# Altium PCB LM2596S pcb.pcbdoc
Units mil, origin at the board's own origin, x right, y up, seen from the top; angles counter-clockwise.
Board outline 3275 x 2189 mil, 2 copper layers (Top Layer, Bottom Layer); 12 components, 6 nets, 33 pads, 20 vias.
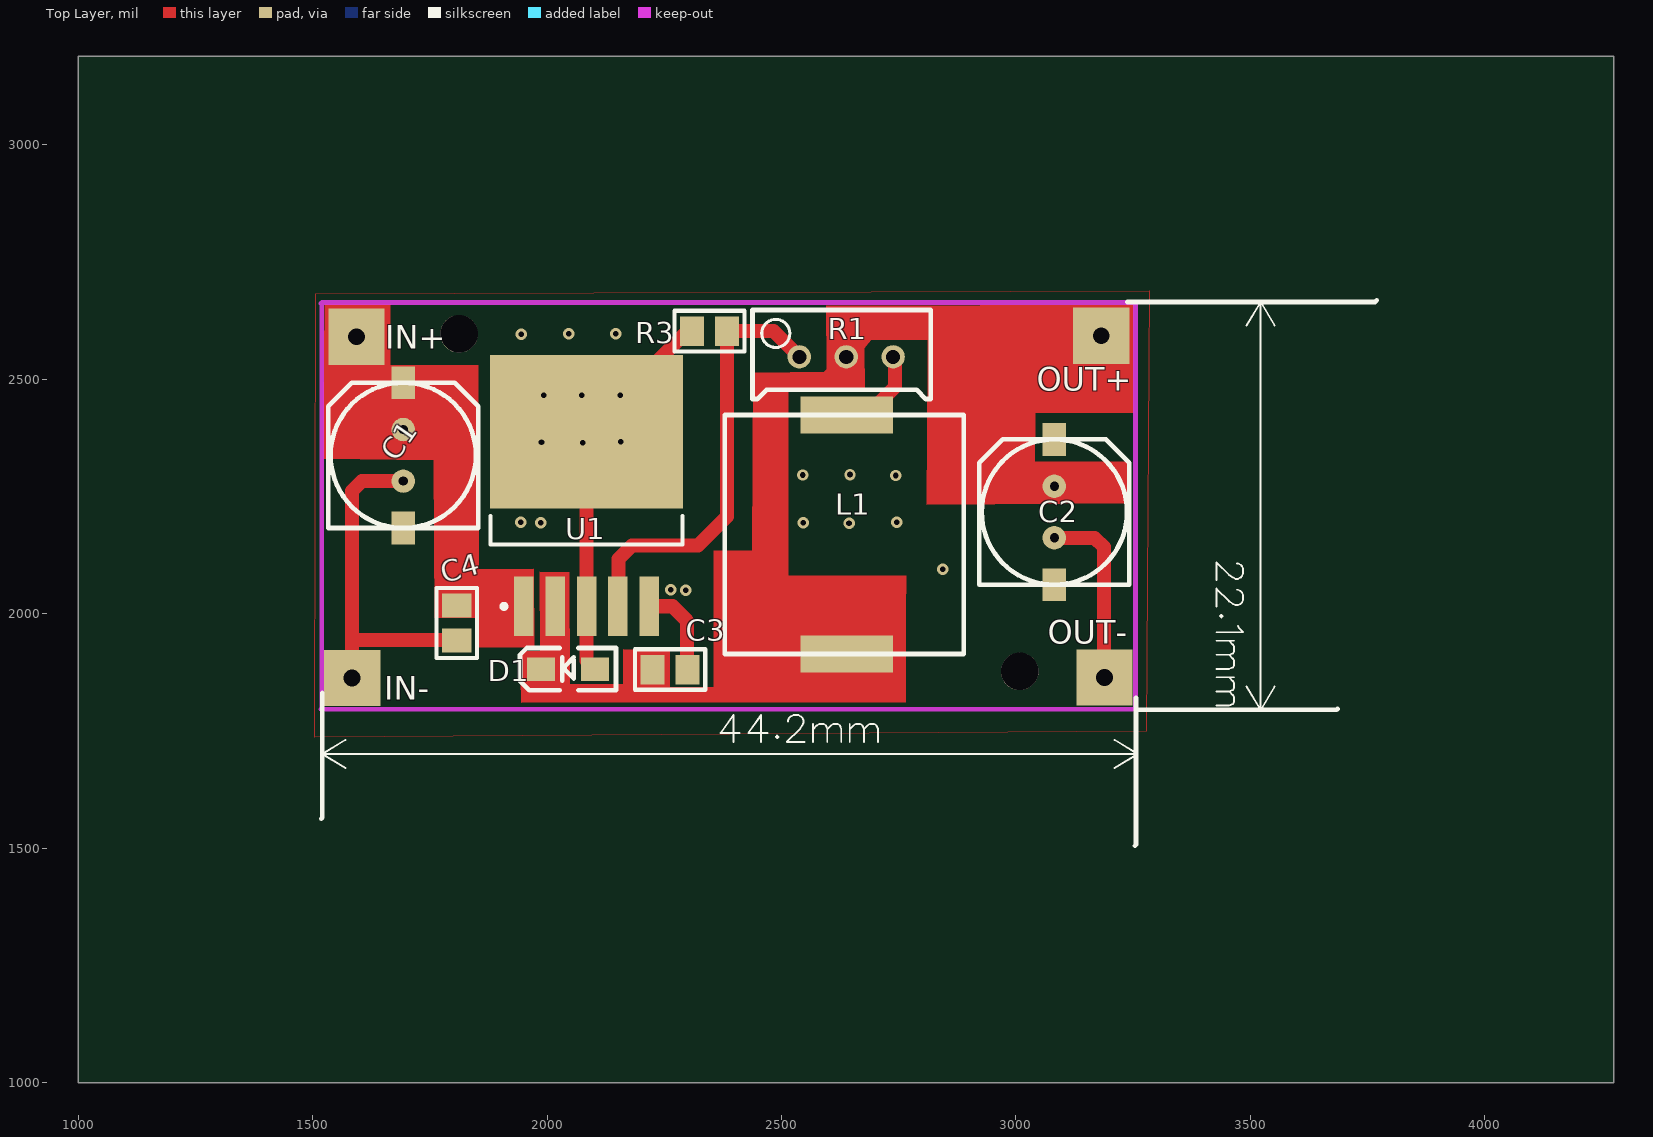
[diagram p0: Top Layer view]
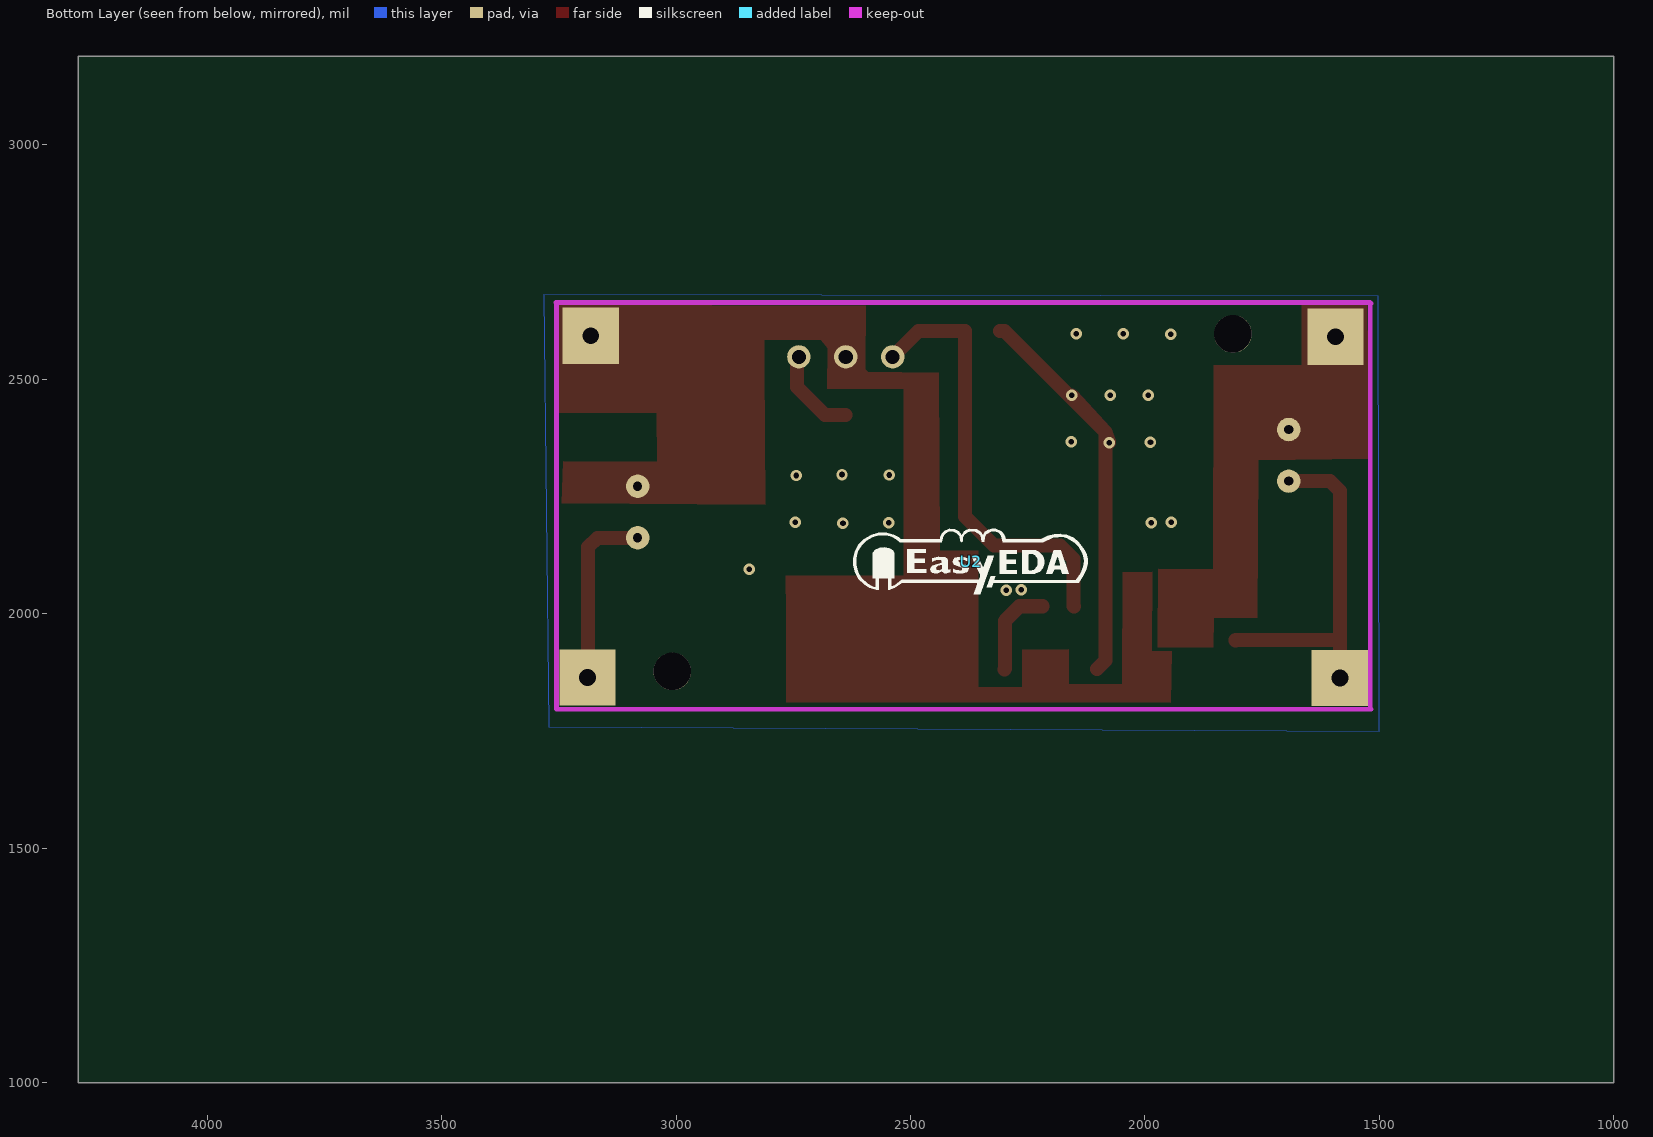
[diagram p1: Bottom Layer view, seen from below]

## Layer stack, top to bottom
Top Solder: solder mask 0.4, Solder Resist, Dk 3.5
Top Layer: signal copper 1.4
Dielectric1: dielectric 12.6, FR-4, Dk 4.8
Bottom Layer: signal copper 1.4
Bottom Solder: solder mask 0.4, Solder Resist, Dk 3.5

## Board outline
4275,1000 1000,1000 1000,3189 4275,3189

## Design rules (kind name [scope] priority, off if disabled: settings)
Clearance [All] p1: gap=10 ignorepadtopadclearanceinfootprint=FALSE except(0: Arc-Hole Track-Hole SMDPad-Hole THPad-Hole Via-Hole Fill-Hole Poly-Hole Region-Hole Text-Hole)
PolygonConnect [All] p1: connectstyle=Relief reliefconductorwidth=10 reliefentries=4 polygonreliefangle="90 Angle" airgapwidth=10
RoutingVias [All] p1: holewidth=28 width=50 viastyle="Through Hole" minholewidth=28 minwidth=50 maxholewidth=28 maxwidth=50
SolderMaskExpansion [All] p1: expansion=4 istentingtop=FALSE
Width [All] p1: maxlimit=10 minlimit=10 preferedwidth=10
30 further rules are at their usual default settings.

## Components (designator, comment, footprint, x,y, rotation, side; value= is the part's Value field where it differs from the comment)
C1 "Cap Pol1" CAP8*12 1533,2183 r0 top
C2 "50V 100UF" CAP8*12 2922,2062 r0 top
C3 "Cap" C0805 2225,1881 r0 top
C4 "Cap" C0805 1807,1943 r90 top
D1 "ss34" Diodes_pick 2147,1837 r90 top
L1 "33uH" "CD127 12*12*7MM" 2889,2424 r180 top
R1 "5k" RW 2638,2548 r270 top
R3 "330" C0805 2309,2603 r0 top
U1 "LM2596S" TS5B 2084,2247 r0 top
U2 "easyedalogo_0.5" easyedalogo_0.5 2370,2111 r0 bottom
? "" ? 2390,1727.35 r0 top
? "" ? 3489.75,2230 r0 top

## Footprints (in the part's own frame and the unit in brackets; to place one, negate y for a bottom-side part, rotate by r counter-clockwise, add the part's x,y. Pads: shape width x height; smd on the part's side, far side on the other; paste and mask are expansions set on the pad)
C0805 [mil]
  rect 51.2x63 smd: 1(0,0) 2(74.8,0)
  silkscreen extent -37,-43 112,43
CAP8*12 [mil]
  round 50 hole 19.69: 1(160,210) 2(160,100)
  rect 50x70 smd: 3(160,0) 3(160,310)
  silkscreen extent 0,0 320,310
"CD127 12*12*7MM" [mm]
  rect 5x2 smd: P$1(6.35,12.954) P$2(6.35,0)
  silkscreen extent 0,0 12.95,12.95
Diodes_pick [mil]
  rect 50x60 smd: 1(45,45) 2(45,160)
  silkscreen extent 0,0 90,205
easyedalogo_0.5 [mil]
  silkscreen extent -248,-70 252,69
RW [mil]
  round 50 hole 30: 1(0,-100) 2(0,0) 3(0,100)
  silkscreen extent -100,-200 90,180
TS5B [mil]
  rect 41.5x126.5 smd: 1(-134,-231) 2(-67,-231) 3(0,-231) 4(67,-231) 5(134,-231)
  rect 411.5x327.5 smd: 6(0,141)
  silkscreen extent -205,-236 205,-38
? [mil]
  silkscreen extent -870,-56 870,56

## Free pads (board coordinates)
  rect 120x120 hole 36: 28(1584,1863) 28(1593,2591) 28(3182,2593) 28(3189,1864)
  round 80 hole 80 unplated: ""(1812,2597) ""(3008,1877)

## Via types
v1: diameter 24.4, hole 12, Top Layer to Bottom Layer, 20 vias

## Nets (pads, with @x,y where several pads share a name; then routed paths per layer and width w, separated by ;. In a path a pad name is that pad's centre, name@x,y a point inside that pad or via, vN(x,y) a via of type N, cw(c..) or ccw(c..) an arc to the next point about the centre after c; other vN are vias at no path point)
$BOARDOUTLINENET: 
GND: C1.2 C2.2 C3.2 C4.1 D1.1 pad.28@1584,1863 pad.28@3189,1864 R3.1 U1.3 U1.5 U1.6 | length 2304.4
  Top Layer w30: pad.28@1584,1863 1584,2262 1605,2283 C1.2 ; 1584,1960 1584,1944 1806,1944 C4.1 ; v1(2076,2365) U1.6 ; D1.1 2084,1900 U1.3 U1.6 ; v1(2156,2466) U1.6 ; U1.5 2267,2016 2291.5,1991.5 2298,1985 2298,1882.8 C3.2 ; R3.1 2299,2603 U1.6 ; C2.2 3168,2162 3188,2142 3188,1865 pad.28@3189,1864
  other v1: 2296,2050 2264,2051 2844,2095 2644,2193 1986,2194 2546,2194 1944,2195 2746,2195 2744,2295 2545,2296 2646,2297 1945,2596 2046,2597 2146,2597
IN+: C1.1 C4.2 pad.28@1593,2591 U1.1 | length 899.5
  Top Layer w30: pad.28@1593,2591 1585,2433 1627,2391 1691,2391 C1.1 1775,2393 1808,2360 1808,2018.8 C4.2 1948.2,2017.8 U1.1
OUT+: C2.1 C3.1 D1.2 L1.P$1 pad.28@3182,2593 R1.2 U1.2 | length 2669.7
  Top Layer w30: U1.2 2017,1912 D1.2 1987,1862 2023,1826 2551,1826 L1.P$1 2456,2097 2456,2475 2472,2491 2481,2500 2595,2500 2638,2543 R1.2 2638,2553 2693,2608 2911,2608 2965,2554 2965,2305 2999,2271 3081,2271 C2.1 ; 2197,1826 2225,1854 C3.1 ; 2227,1826 2225,1828 C3.1 ; 2256,1826 2225,1857 C3.1
R1_3: L1.P$2 R1.3 | length 193.5
  Top Layer w30: L1.P$2 2682,2424 2742,2484 2742,2544 R1.3
R3_2: R1.1 R3.2 U1.4 | length 943
  Top Layer w30: U1.4 2152,2017 2152,2117 2181,2146 2322,2146 2383.8,2207.8 R3.2 2483,2603 R1.1
pads on no net: C1.3 C2.3
copper on no net:
  other v1: 1988,2366 2157,2367 1993,2466 2074,2466

## Polygon pours and split planes (outlines as drawn)
GND on Bottom Layer "Bottom Layer-GND" (solid, pour order 0): 1502,2677 3282,2681 3272,1759 1500,1749
GND on Top Layer "Top Layer-GND" (solid, pour order 1): 1506,2683 3284,2689 3278,1749 1504,1737 1504,1757

## Keep-outs
Keep-Out Layer:
  lines w10: 1517,2662 1519,2664 3257,2664 3255,2662 3255,1796 1517,1796 1519,1798 1519,2663

## Other copper
Top Layer:
  region: 1984,2090 1985,1921 1943,1920 1945,1810 2765,1811 2765,2003 2766,2081 2514,2081 2514,2479 2677,2480 2676,2566 2690,2583 2812,2585 2812,2530 2810,2233 3244,2236 3241,2325 3040,2324 3041,2429 3250,2428 3251,2659 2595,2657 2596,2528 2598,2516 2440,2514 2438,2134 2355,2134 2355,1843 2262,1843 2262,1923 2190,1923 2162,1924 2162,1850 2048,1850 2047,2089
  region net IN+: 1526,2659 1522,2331 1758,2327 1760,1991 1853,1991 1854,1929 1972,1929 1971,2096 1854,2095 1853,2530 1665,2531 1665,2661

## Silkscreen, mask and mechanical layers (free items; w line width, h text height)
Top Overlay:
  lines w10: 1518,1563 1520,1565 1520,1831 ; 3238,2665 3766,2665 3770,2669 ; 3254,1505 3256,1507 3256,1821 ; 3256,1795 3684,1795 3686,1797
  text "IN+" at 1655,2565 h50
  text "OUT+" at 3044,2476 h50
  text "OUT-" at 3068,1936 h50
  text "IN-" at 1652,1817 h50